# Altium PCB Kasli-DIOT.PCBDOC (part 17 of 23)
Units mm, origin at the board's own origin, x right, y up, seen from the top; angles counter-clockwise.
Board outline 222.9 x 100 mm, 10 copper layers (TopLayer, Layer 2, Layer 3, Layer 4, Layer 5, Layer 6, Layer 7, layer 8, Layer 9, BottomLayer), stack 1.564 mm thick; 977 components, 900 nets, 4676 pads, 2725 vias.
Unrouted connection lines stored in the file: 17.
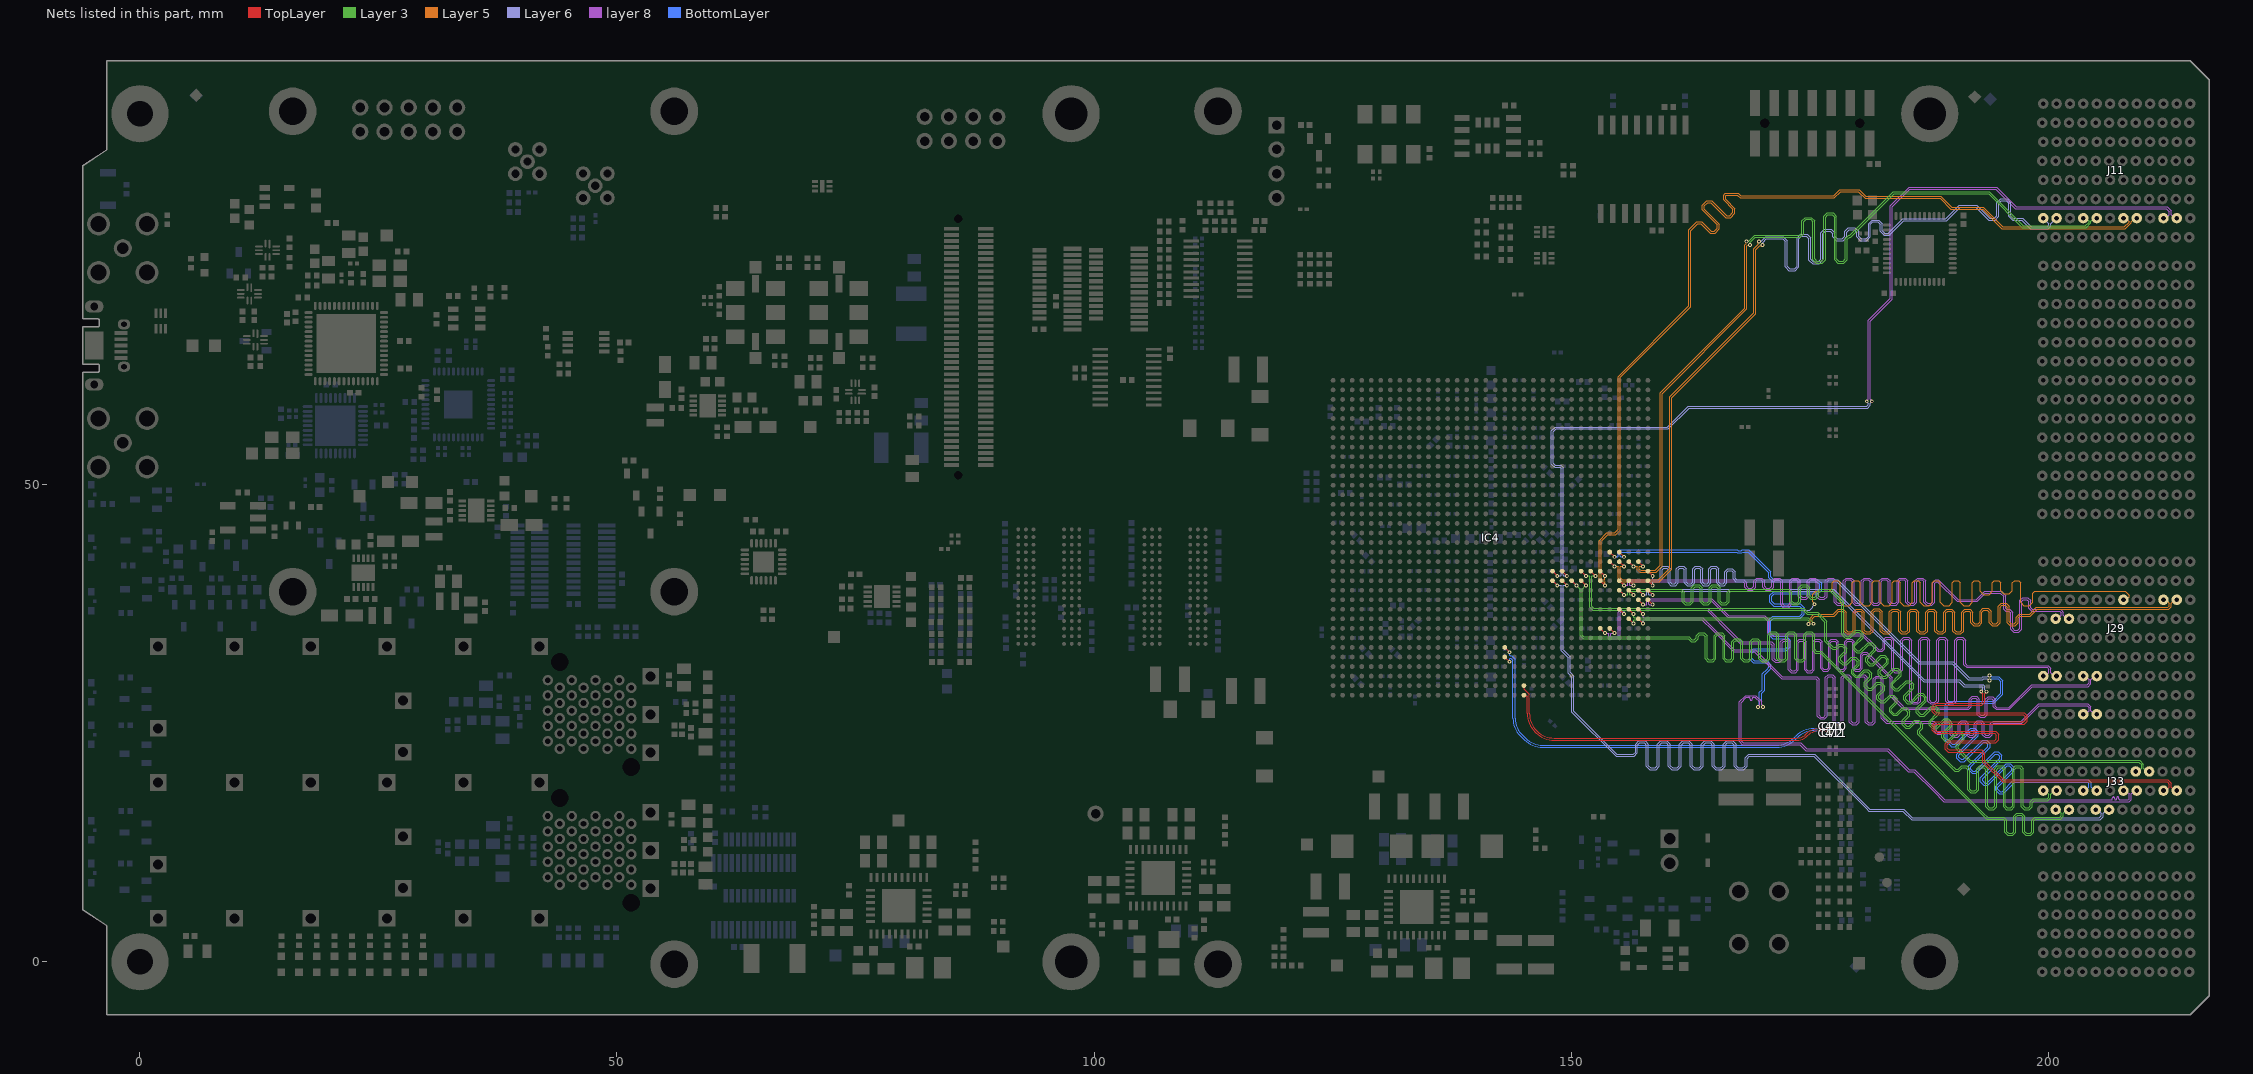
[diagram p23: the nets of this part, all layers, seen from the top]

## Via types
v1: diameter 0.4, hole 0.2, TopLayer to BottomLayer, tented both sides, 1723 vias
v2: diameter 0.5, hole 0.2, TopLayer to BottomLayer, tented both sides, 524 vias
v3: diameter 0.6, hole 0.3, TopLayer to BottomLayer, tented both sides, 172 vias
v4: diameter 0.6, hole 0.3, TopLayer to BottomLayer, 113 vias
v5: diameter 0.5, hole 0.2, TopLayer to BottomLayer, 107 vias
v6: diameter 0.4, hole 0.2, TopLayer to BottomLayer, 67 vias
v7: diameter 0.5, hole 0.25, TopLayer to BottomLayer, tented both sides, 12 vias
v8: diameter 0.8, hole 0.5, TopLayer to BottomLayer, tented both sides, 7 vias

## Nets (pads, with @x,y where several pads share a name; then routed paths per layer and width w, separated by ;. In a path a pad name is that pad's centre, name@x,y a point inside that pad or via, vN(x,y) a via of type N, cw(c..) or ccw(c..) an arc to the next point about the centre after c; other vN are vias at no path point) (continued)
SLOT2.LVDS_4_N: IC4.AB32 J29.K5 | length 99.8
  TopLayer w0.095: IC4.AB32@156.061,39.95 v1(156.561,39.45)
  layer 8 w0.075: v1(156.561,39.45) 156.206,39.45 156.162,39.494 156.162,39.71 156.302,39.85 166.341,39.85 168.026,39.85 168.21,39.666 168.21,39.257 168.513,38.954 169.049,38.954 169.351,39.257 169.351,39.84 169.536,40.024 169.904,40.024 170.088,39.84 170.088,39.257 170.391,38.954 170.927,38.954 171.229,39.257 171.229,39.84 171.414,40.024 171.782,40.024 171.966,39.84 171.966,37.425 172.269,37.123 172.805,37.123 173.107,37.425 173.107,39.84 173.292,40.024 173.66,40.024 173.844,39.84 173.844,38.316 174.147,38.014 174.683,38.014 174.985,38.316 174.985,39.84 175.17,40.024 175.538,40.024 175.722,39.84 175.722,38.29 176.025,37.988 176.561,37.988 176.863,38.29 176.863,39.84 177.048,40.024 177.416,40.024 177.6,39.84 177.6,37.678 177.903,37.375 178.439,37.375 178.741,37.678 178.741,39.84 178.926,40.024 179.294,40.024 179.478,39.84 179.478,37.678 179.781,37.375 180.317,37.375 180.619,37.678 180.619,39.84 180.804,40.024 181.172,40.024 181.356,39.84 181.356,37.678 181.659,37.375 182.195,37.375 182.497,37.678 182.497,39.84 182.682,40.024 183.05,40.024 183.234,39.84 183.234,37.678 183.537,37.375 184.073,37.375 184.375,37.678 184.375,39.84 184.56,40.024 184.928,40.024 185.112,39.84 185.112,37.678 185.415,37.375 185.951,37.375 186.253,37.678 186.253,39.84 186.438,40.024 186.806,40.024 186.99,39.84 186.99,37.678 187.293,37.375 187.829,37.375 188.131,37.678 188.131,39.666 188.316,39.85 188.412,39.85 190.489,37.773 192.568,37.773 193.443,38.648 194.692,38.648 ; 194.692,38.654 195.011,38.654 195.359,38.307 195.359,36.969 195.521,36.807 195.58,36.748 195.748,36.748 ; 195.749,36.749 195.909,36.749 196.093,36.565 196.093,34.862 196.396,34.56 196.932,34.56 197.234,34.862 197.234,37.792 197.418,37.976 197.787,37.976 197.971,37.792 197.971,37.052 198.274,36.749 198.868,36.749 ; 198.869,36.75 199.393,36.75 201.226,36.75 201.399,36.577 201.399,36.311 201.038,35.95 J29.K5@200.8,35.95
SLOT2.LVDS_4_P: IC4.AB31 J29.J5 | length 100.5
  TopLayer w0.095: IC4.AB31@155.061,39.95 v1(155.561,39.45)
  layer 8 w0.075: v1(155.561,39.45) 155.916,39.45 155.96,39.494 155.96,39.794 156.218,40.052 166.341,40.052 168.11,40.052 168.412,39.749 168.412,39.341 168.597,39.157 168.965,39.157 169.149,39.341 169.149,39.923 169.452,40.226 169.988,40.226 170.29,39.923 170.29,39.341 170.475,39.157 170.843,39.157 171.027,39.341 171.027,39.923 171.33,40.226 171.866,40.226 172.168,39.923 172.168,37.509 172.353,37.325 172.721,37.325 172.905,37.509 172.905,39.923 173.208,40.226 173.744,40.226 174.046,39.923 174.046,38.4 174.231,38.216 174.599,38.216 174.783,38.4 174.783,39.923 175.086,40.226 175.622,40.226 175.924,39.923 175.924,38.374 176.109,38.19 176.477,38.19 176.661,38.374 176.661,39.923 176.964,40.226 177.5,40.226 177.802,39.923 177.802,37.762 177.987,37.577 178.355,37.577 178.539,37.762 178.539,39.923 178.842,40.226 179.378,40.226 179.68,39.923 179.68,37.762 179.865,37.577 180.233,37.577 180.417,37.762 180.417,39.923 180.72,40.226 181.256,40.226 181.558,39.923 181.558,37.762 181.743,37.577 182.111,37.577 182.295,37.762 182.295,39.923 182.598,40.226 183.134,40.226 183.436,39.923 183.436,37.762 183.621,37.577 183.989,37.577 184.173,37.762 184.173,39.923 184.476,40.226 185.012,40.226 185.314,39.923 185.314,37.762 185.499,37.577 185.867,37.577 186.051,37.762 186.051,39.923 186.354,40.226 186.89,40.226 187.192,39.923 187.192,37.762 187.377,37.577 187.745,37.577 187.929,37.762 187.929,39.749 188.232,40.052 188.412,40.052 188.496,40.052 190.573,37.975 192.484,37.975 193.359,38.85 194.608,38.85 194.615,38.856 195.095,38.856 195.561,38.39 195.561,38.216 195.561,37.053 195.663,36.95 ; 195.666,36.951 195.993,36.951 196.295,36.649 196.295,34.946 196.479,34.762 196.848,34.762 197.032,34.946 197.032,37.876 197.335,38.178 197.871,38.178 198.173,37.876 198.173,37.135 198.357,36.951 198.785,36.951 ; 198.786,36.952 199.393,36.952 201.31,36.952 201.601,36.661 201.601,36.311 201.962,35.95 J29.J5@202.2,35.95
SLOT2.LVDS_5_N: IC4.AB25 J33.H3 | length 100.2
  TopLayer w0.095: IC4.AB25@149.061,39.95 v1(149.561,39.45)
  Layer 6 w0.08: v1(149.561,39.45) 149.211,39.45 149.165,39.403 149.165,32.7 149.895,31.969 149.895,30.353 150.308,29.939 150.308,26.245 154.803,21.75 156.425,21.75 156.526,21.75 156.761,21.985 156.761,22.801 157.118,23.158 157.761,23.158 158.117,22.801 158.117,20.578 158.353,20.342 158.824,20.342 159.059,20.578 159.059,22.801 159.416,23.158 160.059,23.158 160.415,22.801 160.415,20.578 160.651,20.342 161.122,20.342 161.357,20.578 161.357,22.801 161.714,23.158 162.357,23.158 162.713,22.801 162.713,20.578 162.949,20.342 163.42,20.342 163.655,20.578 163.655,22.801 164.012,23.158 164.655,23.158 165.011,22.801 165.011,20.578 165.247,20.342 165.718,20.342 165.953,20.578 165.953,22.801 166.31,23.158 166.953,23.158 167.309,22.801 167.309,20.578 167.545,20.342 168.016,20.342 168.251,20.578 168.251,21.393 168.608,21.75 169.745,21.75 175.547,21.75 181.013,16.284 181.318,15.979 184.873,15.979 185.776,15.076 205.383,15.076 205.596,15.289 205.596,15.599 205.245,15.95 J33.H3@205,15.95
SLOT2.LVDS_5_P: IC4.AB24 J33.G3 | length 100.8
  TopLayer w0.095: IC4.AB24@148.061,39.95 v1(148.561,39.45)
  Layer 6 w0.08: v1(148.561,39.45) 148.911,39.45 148.958,39.403 148.958,32.614 149.688,31.884 149.688,30.267 150.101,29.854 150.101,26.16 154.718,21.543 156.425,21.543 156.612,21.543 156.968,21.9 156.968,22.715 157.204,22.951 157.675,22.951 157.91,22.715 157.91,20.492 158.267,20.135 158.91,20.135 159.266,20.492 159.266,22.715 159.502,22.951 159.973,22.951 160.208,22.715 160.208,20.492 160.565,20.135 161.208,20.135 161.564,20.492 161.564,22.715 161.8,22.951 162.271,22.951 162.506,22.715 162.506,20.492 162.863,20.135 163.506,20.135 163.862,20.492 163.862,22.715 164.098,22.951 164.569,22.951 164.804,22.715 164.804,20.492 165.161,20.135 165.804,20.135 166.16,20.492 166.16,22.715 166.396,22.951 166.867,22.951 167.102,22.715 167.102,20.492 167.459,20.135 168.102,20.135 168.458,20.492 168.458,21.308 168.694,21.543 169.745,21.543 175.461,21.543 180.927,16.077 181.232,15.772 184.787,15.772 185.691,14.869 205.469,14.869 205.803,15.203 205.803,15.599 206.155,15.95 J33.G3@206.4,15.95
SLOT2.LVDS_6_N: IC4.AB27 J33.K3 | length 102
  TopLayer w0.095: IC4.AB27@151.061,39.95 v1(151.561,39.45)
  Layer 3 w0.075: v1(151.561,39.45) 151.161,39.05 151.161,34.25 151.261,34.15 151.361,34.05 162.382,34.05 162.491,33.941 162.671,33.761 162.932,33.761 163.116,33.945 163.116,34.17 163.419,34.473 163.955,34.473 164.257,34.17 164.257,31.843 164.441,31.659 164.81,31.659 164.994,31.843 164.994,34.17 165.297,34.473 165.833,34.473 166.135,34.17 166.135,31.843 166.319,31.659 166.688,31.659 166.872,31.843 166.872,33.555 167.175,33.858 167.711,33.858 168.013,33.555 168.013,31.843 168.197,31.659 168.566,31.659 168.75,31.843 168.75,33.56 169.053,33.863 169.589,33.863 169.891,33.56 169.891,31.843 170.075,31.659 170.444,31.659 170.628,31.843 170.628,34.295 170.931,34.598 171.467,34.598 171.769,34.295 171.769,31.843 171.953,31.659 172.322,31.659 172.506,31.843 172.506,34.295 172.809,34.598 173.345,34.598 173.647,34.295 173.647,31.843 173.831,31.659 174.2,31.659 174.384,31.843 174.384,34.295 174.687,34.598 175.223,34.598 175.525,34.295 175.525,32.751 175.709,32.567 176.254,32.567 184.814,24.007 193.231,15.589 193.671,15.15 194.021,15.15 195.383,15.15 195.686,14.847 195.686,13.64 195.87,13.456 196.238,13.456 196.423,13.64 196.423,15.283 196.725,15.586 197.261,15.586 197.564,15.283 197.564,13.64 197.748,13.456 198.116,13.456 198.301,13.64 198.301,14.847 198.603,15.15 200.662,15.15 201.232,15.15 201.399,15.317 201.399,15.589 201.038,15.95 J33.K3@200.8,15.95
SLOT2.LVDS_6_P: IC4.AB26 J33.J3 | length 102.7
  TopLayer w0.095: IC4.AB26@150.061,39.95 v1(150.561,39.45)
  Layer 3 w0.075: v1(150.561,39.45) 150.959,39.052 150.959,34.166 151.159,33.966 151.277,33.848 162.299,33.848 162.491,33.656 162.588,33.559 163.016,33.559 163.318,33.862 163.318,34.087 163.502,34.271 163.871,34.271 164.055,34.087 164.055,31.759 164.358,31.457 164.894,31.457 165.196,31.759 165.196,34.087 165.38,34.271 165.749,34.271 165.933,34.087 165.933,31.759 166.236,31.457 166.772,31.457 167.074,31.759 167.074,33.472 167.258,33.656 167.627,33.656 167.811,33.472 167.811,31.759 168.114,31.457 168.65,31.457 168.952,31.759 168.952,33.476 169.136,33.66 169.505,33.66 169.689,33.476 169.689,31.759 169.992,31.457 170.528,31.457 170.83,31.759 170.83,34.212 171.014,34.396 171.383,34.396 171.567,34.212 171.567,31.759 171.87,31.457 172.406,31.457 172.708,31.759 172.708,34.212 172.892,34.396 173.261,34.396 173.445,34.212 173.445,31.759 173.748,31.457 174.284,31.457 174.586,31.759 174.586,34.212 174.77,34.396 175.139,34.396 175.323,34.212 175.323,32.667 175.626,32.365 176.17,32.365 176.254,32.281 184.612,23.923 193.017,15.518 193.587,14.948 194.021,14.948 195.299,14.948 195.484,14.764 195.484,13.556 195.786,13.254 196.322,13.254 196.625,13.556 196.625,15.2 196.809,15.384 197.177,15.384 197.362,15.2 197.362,13.556 197.664,13.254 198.2,13.254 198.503,13.556 198.503,14.764 198.687,14.948 200.662,14.948 201.316,14.948 201.601,15.233 201.601,15.589 201.962,15.95 J33.J3@202.2,15.95
SLOT2.LVDS_7_N: IC4.AC34 J33.C4 | length 109.2
  TopLayer w0.095: IC4.AC34@158.061,38.95 v1(158.561,38.45) ; v1(193.002,28.32) 193.002,28.281 193.17,28.112 193.17,27.55 193.17,27.288 192.981,27.099 188.182,27.099 187.862,26.78 187.862,26.217 188.182,25.898 197.422,25.898 197.611,25.709 197.611,25.33 197.422,25.141 188.182,25.141 187.862,24.822 187.862,24.259 188.182,23.94 194.402,23.94 194.591,23.751 194.591,23.372 194.402,23.183 189.556,23.183 189.237,22.864 189.237,22.301 189.556,21.982 192.981,21.982 193.17,21.793 193.17,21.68 193.17,20.927 195.247,18.85 212.475,18.85 212.689,18.636 212.689,18.307 212.332,17.95 J33.C4@212.1,17.95
  Layer 6 w0.08: v1(158.561,38.45) 158.211,38.45 158.165,38.497 158.165,38.754 158.261,38.85 177.459,38.85 186.966,29.343 190.668,29.343 191.168,28.843 193.123,28.843 193.179,28.787 193.179,28.527 193.002,28.35 v1(193.002,28.32)
SLOT2.LVDS_7_P: IC4.AC33 J33.B4 | length 109.9
  TopLayer w0.095: IC4.AC33@157.061,38.95 v1(157.561,38.45) ; v1(193.561,28.317) 193.561,28.278 193.392,28.109 193.392,27.55 193.392,27.196 193.073,26.877 188.274,26.877 188.084,26.688 188.084,26.309 188.274,26.12 197.514,26.12 197.833,25.801 197.833,25.238 197.514,24.919 188.274,24.919 188.084,24.73 188.084,24.351 188.274,24.162 194.494,24.162 194.813,23.843 194.813,23.28 194.494,22.961 189.648,22.961 189.459,22.772 189.459,22.393 189.648,22.204 193.073,22.204 193.392,21.885 193.392,21.68 193.392,21.019 195.339,19.072 212.567,19.072 212.911,18.728 212.911,18.307 213.268,17.95 J33.B4@213.5,17.95
  Layer 6 w0.08: v1(157.561,38.45) 157.911,38.45 157.958,38.497 157.958,38.839 158.175,39.057 177.545,39.057 187.052,29.55 190.754,29.55 191.254,29.05 193.209,29.05 193.386,28.873 193.386,28.524 193.561,28.349 v1(193.561,28.317)
SLOT2.LVDS_8_N: IC4.W31 J33.F4 | length 108
  TopLayer w0.095: IC4.W31@155.061,42.95 v1(155.561,42.45)
  layer 8 w0.075: v1(169.603,26.714) 169.603,26.757 169.765,26.92 169.765,27.24 169.304,27.701 169.296,27.709 169.105,27.709 ccw(c169.105,27.597) 168.992,27.597 168.992,27.514 cw(c168.88,27.514) 168.88,27.401 cw(c168.88,27.514) 168.767,27.514 168.767,27.597 ccw(c168.655,27.597) 168.655,27.709 168.392,27.709 168.375,27.709 167.84,27.174 167.84,23.18 168.047,22.973 174.068,22.973 174.663,22.378 174.708,22.333 183.237,22.333 183.562,22.008 185.435,20.135 186.013,20.135 188.072,18.075 189.172,16.975 195.102,16.975 206.45,16.975 206.637,16.975 ccw(c206.637,17.087) 206.75,17.087 206.75,17.171 cw(c206.862,17.171) 206.862,17.283 cw(c206.862,17.171) 206.975,17.171 206.975,17.088 ccw(c207.087,17.088) 207.087,16.975 ccw(c207.087,17.088) 207.2,17.088 207.2,17.171 cw(c207.312,17.171) 207.312,17.283 cw(c207.312,17.171) 207.425,17.171 207.425,17.087 ccw(c207.537,17.087) 207.537,16.975 207.8,16.975 208.411,16.975 208.499,17.063 208.499,17.601 208.149,17.95 J33.F4@207.9,17.95
  BottomLayer w0.095: v1(155.561,42.45) 155.228,42.45 155.172,42.506 155.172,42.827 155.299,42.954 167.351,42.954 167.45,42.855 167.922,42.855 168.021,42.954 168.557,42.954 169.561,41.95 170.739,40.772 170.739,40.45 170.739,40.246 171.133,39.851 175.783,39.851 176.047,39.587 176.047,39.058 175.783,38.794 171.228,38.794 170.833,38.4 170.833,37.688 171.228,37.293 173.96,37.293 174.225,37.029 174.225,36.5 173.96,36.236 171.133,36.236 170.739,35.842 170.739,35.532 170.739,34.483 170.739,34.279 171.133,33.885 172.483,33.885 172.747,33.62 172.747,33.092 172.483,32.828 169.125,32.828 168.731,32.433 168.731,31.721 169.125,31.327 170.475,31.327 170.739,31.062 170.739,30.867 170.55,30.678 170.061,30.189 170.061,28.539 169.755,28.233 169.755,26.922 169.603,26.769 v1(169.603,26.714)
SLOT2.LVDS_8_P: IC4.W30 J33.E4 | length 108.9
  TopLayer w0.095: IC4.W30@154.061,42.95 v1(154.561,42.45)
  layer 8 w0.075: v1(170.13,26.714) 170.13,26.757 169.967,26.92 169.967,27.323 169.38,27.911 168.291,27.911 167.638,27.258 167.638,23.096 167.963,22.771 173.984,22.771 174.52,22.235 ; 174.521,22.234 174.624,22.131 183.153,22.131 183.478,21.806 185.351,19.933 185.929,19.933 188.001,17.861 189.089,16.773 195.019,16.773 195.102,16.773 208.495,16.773 208.701,16.979 208.701,17.399 208.701,17.601 209.05,17.95 J33.E4@209.3,17.95
  BottomLayer w0.095: v1(154.561,42.45) 154.894,42.45 154.95,42.506 154.95,42.919 155.207,43.176 167.443,43.176 167.542,43.078 167.83,43.078 167.929,43.176 168.649,43.176 169.783,42.042 170.961,40.864 170.961,40.45 170.961,40.337 171.225,40.073 175.875,40.073 176.269,39.679 176.269,38.967 175.875,38.572 171.32,38.572 171.055,38.308 171.055,37.779 171.32,37.515 174.052,37.515 174.447,37.121 174.447,36.409 174.052,36.014 171.225,36.014 170.961,35.75 170.961,35.532 170.961,34.483 170.961,34.371 171.225,34.107 172.575,34.107 172.969,33.712 172.969,33 172.575,32.606 169.217,32.606 168.953,32.341 168.953,31.813 169.217,31.549 170.567,31.549 170.961,31.154 170.961,30.775 170.864,30.678 170.283,30.097 170.283,28.447 169.977,28.141 169.977,26.922 170.13,26.769 v1(170.13,26.714)
SLOT2.LVDS_9_N: IC4.AB34 J33.I4 | length 110.3
  TopLayer w0.095: IC4.AB34@158.061,39.95 v1(158.561,39.45)
  Layer 6 w0.08: v1(158.561,39.45) 158.561,39.8 158.608,39.846 159.084,39.846 159.271,39.846 159.553,40.128 159.553,41.115 159.713,41.275 160.034,41.275 160.195,41.115 160.195,39.719 160.476,39.437 160.969,39.437 161.251,39.719 161.251,41.115 161.411,41.275 161.732,41.275 161.893,41.115 161.893,39.719 162.174,39.437 162.667,39.437 162.949,39.719 162.949,41.115 163.109,41.275 163.43,41.275 163.591,41.115 163.591,39.719 163.872,39.437 164.365,39.437 164.647,39.719 164.647,41.115 164.807,41.275 165.128,41.275 165.289,41.115 165.289,39.719 165.57,39.437 166.063,39.437 166.345,39.719 166.345,40.815 166.505,40.975 166.826,40.975 166.987,40.815 166.987,40.128 167.268,39.846 168.794,39.846 177.872,39.846 186.468,31.25 189.968,31.25 191.642,29.576 193.166,29.576 193.247,29.658 193.654,29.658 193.814,29.498 v1(193.861,29.498)
  BottomLayer w0.095: v1(193.861,29.498) 193.944,29.498 194.096,29.65 194.761,29.65 194.961,29.45 195.039,29.372 195.039,28.139 194.234,27.334 189.625,27.334 189.217,26.926 189.217,23.214 189.728,22.703 189.873,22.558 190.289,22.558 191.998,24.267 192.23,24.267 192.462,24.034 192.462,23.802 190.43,21.77 190.43,21.354 190.792,20.991 191.208,20.991 193.241,23.024 193.473,23.024 193.705,22.791 193.705,22.559 191.673,20.527 191.673,20.111 192.035,19.748 192.452,19.748 194.484,21.78 194.716,21.78 194.948,21.548 194.948,21.316 192.916,19.284 192.916,18.867 193.278,18.505 193.695,18.505 195.727,20.537 195.959,20.537 196.191,20.305 196.191,20.073 194.526,18.408 194.526,17.991 194.889,17.629 195.305,17.629 196.52,18.845 196.93,18.845 204.145,18.845 204.289,18.701 204.289,18.307 203.932,17.95 J33.I4@203.7,17.95
SLOT2.LVDS_9_P: IC4.AA34 J33.H4 | length 110.7
  TopLayer w0.095: IC4.AA34@158.061,40.95 v1(158.561,40.45)
  Layer 6 w0.08: v1(158.561,40.45) 158.561,40.1 158.608,40.053 159.084,40.053 159.185,40.053 159.346,40.214 159.346,41.201 159.627,41.482 160.12,41.482 160.402,41.201 160.402,39.804 160.562,39.644 160.883,39.644 161.044,39.804 161.044,41.201 161.325,41.482 161.818,41.482 162.1,41.201 162.1,39.804 162.26,39.644 162.581,39.644 162.742,39.804 162.742,41.201 163.023,41.482 163.516,41.482 163.798,41.201 163.798,39.804 163.958,39.644 164.279,39.644 164.44,39.804 164.44,41.201 164.721,41.482 165.214,41.482 165.496,41.201 165.496,39.804 165.656,39.644 165.977,39.644 166.138,39.804 166.138,40.901 166.419,41.182 166.912,41.182 167.194,40.901 167.194,40.214 167.354,40.053 168.794,40.053 177.958,40.053 186.554,31.457 190.054,31.457 191.728,29.783 193.08,29.783 193.162,29.865 193.654,29.865 193.814,30.025 v1(193.861,30.025)
  BottomLayer w0.095: v1(193.861,30.025) 193.944,30.025 194.096,29.872 194.853,29.872 195.261,29.464 195.261,28.047 194.326,27.112 189.717,27.112 189.439,26.834 189.439,23.306 189.885,22.86 189.965,22.78 190.197,22.78 191.906,24.489 192.322,24.489 192.684,24.126 192.684,23.71 190.652,21.678 190.652,21.446 190.884,21.213 191.116,21.213 193.149,23.246 193.565,23.246 193.927,22.883 193.927,22.467 191.895,20.435 191.895,20.202 192.127,19.97 192.36,19.97 194.392,22.002 194.808,22.002 195.17,21.64 195.17,21.224 193.138,19.192 193.138,18.959 193.37,18.727 193.603,18.727 195.635,20.759 196.051,20.759 196.413,20.397 196.413,19.981 194.748,18.316 194.748,18.083 194.981,17.851 195.213,17.851 196.428,19.067 197.152,19.067 204.237,19.067 204.511,18.793 204.511,18.307 204.868,17.95 J33.H4@205.1,17.95
SLOT2.LVDS_10_N: IC4.AA28 J33.L4 | length 101.4
  TopLayer w0.095: IC4.AA28@152.061,40.95 v1(152.561,40.45)
  Layer 3 w0.075: v1(152.561,40.45) 152.206,40.45 152.162,40.406 152.162,39.45 152.161,39.449 152.161,37.25 152.359,37.052 174.408,37.052 174.832,36.628 175.879,36.628 176.812,35.695 176.812,33.666 177.445,33.033 177.513,32.965 177.774,32.965 178.072,33.262 178.5,33.262 178.879,32.883 178.879,32.456 178.28,31.857 178.28,31.596 178.541,31.336 178.801,31.336 179.4,31.934 179.828,31.934 180.207,31.556 180.207,31.128 179.608,30.529 179.608,30.268 179.868,30.008 180.129,30.008 180.728,30.606 181.156,30.606 181.535,30.228 181.535,29.8 180.936,29.201 180.936,28.94 181.196,28.68 181.457,28.68 182.056,29.279 182.484,29.279 182.862,28.9 182.862,28.472 182.264,27.873 182.264,27.613 182.524,27.352 182.785,27.352 183.384,27.951 183.812,27.951 184.19,27.572 184.19,27.144 183.592,26.545 183.592,26.285 183.852,26.024 184.113,26.024 184.712,26.623 185.139,26.623 185.518,26.244 185.518,25.816 184.92,25.217 184.92,24.957 185.18,24.696 185.441,24.696 186.039,25.295 186.467,25.295 186.846,24.916 186.846,24.488 186.548,24.19 186.548,23.93 186.587,23.891 186.655,23.823 190.019,20.459 190.102,20.376 190.314,20.164 190.574,20.164 190.946,20.536 191.482,20.536 191.785,20.234 191.785,18.095 191.969,17.911 192.338,17.911 192.522,18.095 192.522,20.23 192.824,20.532 193.36,20.532 193.663,20.23 193.663,16.344 193.847,16.16 194.216,16.16 194.4,16.344 194.4,20.23 194.702,20.532 195.238,20.532 195.541,20.23 195.541,16.344 195.725,16.16 196.094,16.16 196.278,16.344 196.278,20.23 196.58,20.532 197.116,20.532 197.419,20.23 197.419,16.344 197.603,16.16 197.972,16.16 198.156,16.344 198.156,16.765 198.458,17.068 199.264,17.068 199.905,17.068 200.099,17.262 200.099,17.589 199.738,17.95 J33.L4@199.5,17.95
SLOT2.LVDS_10_P: IC4.AA27 J33.K4 | length 102
  TopLayer w0.095: IC4.AA27@151.061,40.95 v1(151.561,40.45)
  Layer 3 w0.075: v1(151.561,40.45) 151.916,40.45 151.96,40.406 151.96,39.533 151.959,39.532 151.959,37.166 152.275,36.85 174.324,36.85 174.748,36.426 175.795,36.426 176.61,35.611 176.61,33.582 177.302,32.89 177.371,32.822 177.43,32.763 177.858,32.763 178.155,33.06 178.416,33.06 178.677,32.8 178.677,32.539 178.078,31.941 178.078,31.513 178.457,31.134 178.885,31.134 179.483,31.732 179.744,31.732 180.005,31.472 180.005,31.211 179.406,30.613 179.406,30.185 179.785,29.806 180.213,29.806 180.811,30.404 181.072,30.404 181.333,30.144 181.333,29.883 180.734,29.285 180.734,28.857 181.113,28.478 181.541,28.478 182.139,29.077 182.4,29.077 182.66,28.816 182.66,28.555 182.062,27.957 182.062,27.529 182.441,27.15 182.869,27.15 183.467,27.749 183.728,27.749 183.988,27.488 183.988,27.227 183.39,26.629 183.39,26.201 183.769,25.822 184.197,25.822 184.795,26.421 185.056,26.421 185.316,26.16 185.316,25.9 184.718,25.301 184.718,24.873 185.097,24.494 185.525,24.494 186.123,25.093 186.384,25.093 186.644,24.832 186.644,24.572 186.346,24.274 186.346,23.846 186.444,23.748 186.512,23.68 190.019,20.174 190.23,19.962 190.658,19.962 191.03,20.334 191.399,20.334 191.583,20.15 191.583,18.011 191.885,17.709 192.421,17.709 192.724,18.011 192.724,20.146 192.908,20.33 193.277,20.33 193.461,20.146 193.461,16.26 193.763,15.958 194.299,15.958 194.602,16.26 194.602,20.146 194.786,20.33 195.155,20.33 195.339,20.146 195.339,16.26 195.641,15.958 196.177,15.958 196.48,16.26 196.48,20.146 196.664,20.33 197.033,20.33 197.217,20.146 197.217,16.26 197.519,15.958 198.055,15.958 198.358,16.26 198.358,16.681 198.542,16.866 199.264,16.866 199.988,16.866 200.301,17.178 200.301,17.589 200.662,17.95 J33.K4@200.9,17.95
SLOT2.LVDS_11_N: IC4.AA25 J11.C2 | length 105.1
  TopLayer w0.095: IC4.AA25@149.061,40.95 v1(149.561,40.45)
  Layer 6 w0.08: v1(149.561,40.45) 149.211,40.45 149.165,40.497 149.165,51.839 148.947,52.057 148.361,52.057 148.161,52.257 148.161,55.569 148.442,55.85 160.186,55.85 162.379,58.043 181.092,58.043 181.368,58.319 181.368,58.543 181.528,58.703 v1(181.528,58.75)
  layer 8 w0.075: v1(181.528,58.75) 181.528,58.794 181.366,58.956 181.366,67.149 183.675,69.459 183.675,79.164 185.512,81.001 194.524,81.001 196.467,79.058 196.585,78.94 212.396,78.94 212.699,78.637 212.699,78.299 212.349,77.95 J11.C2@212.1,77.95
SLOT2.LVDS_11_P: IC4.AA24 J11.B2 | length 105.8
  TopLayer w0.095: IC4.AA24@148.061,40.95 v1(148.561,40.45)
  Layer 6 w0.08: v1(148.561,40.45) 148.911,40.45 148.958,40.497 148.958,51.754 148.861,51.85 148.275,51.85 147.954,52.171 147.954,55.655 148.356,56.057 160.1,56.057 162.293,58.25 181.006,58.25 181.161,58.405 181.161,58.543 181.001,58.703 v1(181.001,58.75)
  layer 8 w0.075: v1(181.001,58.75) 181.001,58.794 181.164,58.956 181.164,67.233 183.473,69.542 183.473,79.247 185.429,81.203 194.607,81.203 196.669,79.142 212.48,79.142 212.901,78.721 212.901,78.299 213.25,77.95 J11.B2@213.5,77.95
SLOT2.LVDS_12_N: IC4.AB29 J11.F2 | length 101.8
  TopLayer w0.095: IC4.AB29@153.061,39.95 v1(153.561,39.45)
  Layer 5 w0.08: v1(153.561,39.45) 153.561,39.8 153.514,39.846 153.15,39.846 152.954,40.043 152.954,44.143 153.768,44.957 154.587,44.957 154.954,45.324 154.954,61.343 162.354,68.743 162.354,76.38 162.354,76.736 163.193,77.574 163.697,77.574 164.686,76.585 165.019,76.585 165.352,76.918 165.352,77.251 163.78,78.823 163.78,79.328 164.234,79.782 164.739,79.782 166.311,78.21 166.644,78.21 166.977,78.543 166.977,78.876 165.988,79.865 165.988,80.37 166.12,80.502 166.181,80.562 167.521,80.562 167.809,80.274 177.53,80.274 178.178,80.923 180.218,80.923 180.916,80.225 188.767,80.225 189.91,79.082 193.229,79.082 195.261,77.05 208.014,77.05 208.496,77.533 208.496,77.599 208.145,77.95 J11.F2@207.9,77.95
SLOT2.LVDS_12_P: IC4.AA29 J11.E2 | length 101.4
  TopLayer w0.095: IC4.AA29@153.061,40.95 v1(153.561,40.45)
  Layer 5 w0.08: v1(153.561,40.45) 153.561,40.1 153.514,40.053 153.236,40.053 153.161,40.129 153.161,44.057 153.854,44.75 154.673,44.75 155.161,45.238 155.161,61.257 162.561,68.657 162.561,76.173 162.561,76.65 163.278,77.367 163.611,77.367 164.601,76.378 165.105,76.378 165.559,76.832 165.559,77.337 163.987,78.909 163.987,79.242 164.32,79.575 164.653,79.575 166.226,78.003 166.73,78.003 167.184,78.457 167.184,78.962 166.195,79.951 166.195,80.284 166.266,80.355 167.436,80.355 167.724,80.067 177.615,80.067 178.264,80.716 180.132,80.716 180.83,80.018 188.681,80.018 189.824,78.875 193.143,78.875 195.175,76.843 208.099,76.843 208.703,77.447 208.703,77.599 209.054,77.95 J11.E2@209.3,77.95
SLOT2.LVDS_13_N: IC4.Y33 J11.I2 | length 99.6
  TopLayer w0.095: IC4.Y33@157.061,41.95 v1(157.561,41.45)
  Layer 3 w0.075: v1(168.388,75.523) 168.419,75.554 168.649,75.554 169.246,76.15 173.873,76.15 173.97,76.15 174.204,76.384 174.204,77.66 174.557,78.013 175.193,78.013 175.545,77.66 175.545,73.676 175.78,73.442 176.248,73.442 176.482,73.676 176.482,78.143 176.835,78.495 177.471,78.495 177.823,78.143 177.823,73.676 178.058,73.442 178.526,73.442 178.76,73.676 178.76,75.797 179.113,76.15 179.239,76.15 181.752,78.663 183.799,80.71 193.847,80.71 197.407,77.15 203.91,77.15 204.299,77.539 204.299,77.601 203.949,77.95 J11.I2@203.7,77.95
  Layer 5 w0.08: v1(157.561,41.45) 157.211,41.45 157.165,41.403 157.165,41.166 157.307,41.024 158.835,41.024 159.354,41.543 159.354,59.643 168.234,68.523 168.234,75.142 168.355,75.263 168.355,75.49 v1(168.388,75.523)
SLOT2.LVDS_13_P: IC4.Y32 J11.H2 | length 100.3
  TopLayer w0.095: IC4.Y32@156.061,41.95 v1(156.561,41.45)
  Layer 3 w0.075: v1(168.761,75.15) 168.792,75.181 168.792,75.411 169.329,75.948 173.873,75.948 174.054,75.948 174.406,76.301 174.406,77.576 174.641,77.81 175.109,77.81 175.343,77.576 175.343,73.593 175.696,73.24 176.332,73.24 176.684,73.593 176.684,78.059 176.919,78.293 177.387,78.293 177.621,78.059 177.621,73.593 177.974,73.24 178.61,73.24 178.962,73.593 178.962,75.714 179.197,75.948 179.323,75.948 181.752,78.377 183.883,80.508 193.764,80.508 197.324,76.948 203.994,76.948 204.501,77.455 204.501,77.601 204.85,77.95 J11.H2@205.1,77.95
  Layer 5 w0.08: v1(156.561,41.45) 156.911,41.45 156.958,41.403 156.958,41.08 157.221,40.817 158.921,40.817 159.561,41.457 159.561,59.557 168.441,68.437 168.441,75.056 168.502,75.117 168.728,75.117 v1(168.761,75.15)
SLOT2.LVDS_14_N: IC4.Y31 J11.L2 | length 99.7
  TopLayer w0.095: IC4.Y31@155.061,41.95 v1(155.561,41.45)
  Layer 5 w0.08: v1(155.561,41.45) 155.211,41.45 155.165,41.403 155.165,40.247 155.361,40.05 159.168,40.05 160.354,41.236 160.354,59.236 169.154,68.036 169.154,74.736 169.64,75.222 169.64,75.448 v1(169.701,75.51)
  Layer 6 w0.08: v1(169.701,75.51) 169.735,75.543 169.961,75.543 170.069,75.651 170.4,75.982 171.483,75.982 172.265,75.982 172.647,75.6 172.647,72.93 172.907,72.67 173.428,72.67 173.689,72.93 173.689,75.893 174.07,76.274 174.763,76.274 175.145,75.893 175.145,73.632 175.405,73.372 175.926,73.372 176.187,73.632 176.187,76.406 176.568,76.788 177.261,76.788 177.643,76.406 177.643,76.069 177.903,75.809 178.424,75.809 178.685,76.069 178.685,76.566 179.066,76.947 179.759,76.947 180.141,76.566 180.141,76.072 180.401,75.812 180.922,75.812 181.182,76.072 181.182,77.375 181.564,77.756 182.257,77.756 182.638,77.375 182.638,76.644 182.899,76.383 183.267,76.383 183.928,77.043 184.791,77.907 189.293,77.907 190.693,79.307 192.517,79.307 193.874,77.95 194.286,77.95 194.386,77.95 194.647,78.21 194.647,79.576 195.029,79.958 195.721,79.958 196.103,79.576 196.103,78.21 196.363,77.95 196.955,77.95 197.329,77.95 198.231,77.047 199.956,77.047 200.096,77.188 200.096,77.354 J11.L2@199.5,77.95
SLOT2.LVDS_14_P: IC4.Y30 J11.K2 | length 100.4
  TopLayer w0.095: IC4.Y30@154.061,41.95 v1(154.561,41.45)
  Layer 5 w0.08: v1(154.561,41.45) 154.911,41.45 154.958,41.403 154.958,40.161 155.275,39.843 159.254,39.843 160.561,41.15 160.561,59.15 169.361,67.95 169.361,74.65 169.787,75.076 170.013,75.076 v1(170.074,75.137)
  Layer 6 w0.08: v1(170.074,75.137) 170.107,75.17 170.107,75.396 170.155,75.444 170.486,75.775 171.483,75.775 172.179,75.775 172.44,75.515 172.44,72.844 172.821,72.463 173.514,72.463 173.896,72.844 173.896,75.807 174.156,76.067 174.677,76.067 174.938,75.807 174.938,73.547 175.319,73.165 176.012,73.165 176.394,73.547 176.394,76.321 176.654,76.581 177.175,76.581 177.436,76.321 177.436,75.984 177.817,75.602 178.51,75.602 178.892,75.984 178.892,76.48 179.152,76.74 179.673,76.74 179.934,76.48 179.934,75.987 180.315,75.605 181.008,75.605 181.389,75.987 181.389,77.289 181.65,77.549 182.171,77.549 182.431,77.289 182.431,76.558 182.813,76.176 183.353,76.176 183.928,76.751 184.877,77.7 189.379,77.7 190.779,79.1 192.431,79.1 193.788,77.743 194.286,77.743 194.472,77.743 194.854,78.125 194.854,79.491 195.114,79.751 195.635,79.751 195.896,79.491 195.896,78.125 196.278,77.743 196.955,77.743 197.243,77.743 198.146,76.84 200.042,76.84 200.303,77.102 200.303,77.354 J11.K2@200.9,77.95
SLOT2.LVDS_15_N: IC4.AC32 J33.E5 | length 103.5
  TopLayer w0.095: IC4.AC32@156.061,38.95 v1(156.561,38.45)
  Layer 3 w0.075: v1(156.561,38.45) 156.206,38.45 156.162,38.494 156.162,38.698 156.314,38.85 158.408,38.85 161.487,38.85 161.671,38.666 161.671,37.73 161.974,37.427 162.51,37.427 162.812,37.73 162.812,39.122 162.996,39.306 163.365,39.306 163.549,39.122 163.549,37.73 163.852,37.427 164.388,37.427 164.69,37.73 164.69,39.122 164.874,39.306 165.243,39.306 165.427,39.122 165.427,37.73 165.73,37.427 166.266,37.427 166.568,37.73 166.568,38.666 166.752,38.85 172.755,38.85 172.939,38.666 172.939,37.73 173.242,37.427 173.778,37.427 174.08,37.73 174.08,39.122 174.264,39.306 174.633,39.306 174.817,39.122 174.817,38.316 175.12,38.014 175.656,38.014 175.958,38.316 175.958,38.666 176.142,38.85 176.239,38.85 177.175,38.85 178.371,37.655 178.371,34.318 178.665,34.024 178.792,33.896 179.22,33.896 179.895,34.571 180.155,34.571 180.416,34.31 180.416,34.05 179.559,33.192 179.559,32.765 179.938,32.386 180.366,32.386 181.223,33.243 181.483,33.243 181.744,32.982 181.744,32.722 180.887,31.865 180.887,31.437 181.266,31.058 181.694,31.058 182.551,31.915 182.811,31.915 183.072,31.654 183.072,31.394 182.215,30.537 182.215,30.109 182.594,29.73 183.021,29.73 183.879,30.587 184.139,30.587 184.4,30.326 184.4,30.066 183.543,29.209 183.543,28.781 183.921,28.402 184.349,28.402 185.207,29.259 185.467,29.259 185.728,28.999 185.728,28.738 184.871,27.881 184.871,27.453 185.249,27.074 185.677,27.074 186.535,27.931 186.795,27.931 187.056,27.671 187.056,27.41 186.198,26.553 186.198,26.125 186.577,25.746 187.005,25.746 187.863,26.603 188.123,26.603 188.384,26.343 188.384,26.082 187.526,25.225 187.526,24.797 187.905,24.418 188.333,24.418 189.19,25.275 189.451,25.275 189.712,25.015 189.712,24.754 188.854,23.897 188.854,23.469 189.233,23.09 189.661,23.09 190.518,23.947 190.779,23.947 191.04,23.687 191.04,23.426 190.365,22.752 190.365,22.324 190.65,22.039 191.782,20.907 209.523,20.907 209.799,20.631 209.799,20.311 209.438,19.95 J33.E5@209.2,19.95
SLOT2.LVDS_15_P: IC4.AC31 J33.D5 | length 104.1
  TopLayer w0.095: IC4.AC31@155.061,38.95 v1(155.561,38.45)
  Layer 3 w0.075: v1(155.561,38.45) 155.916,38.45 155.96,38.494 155.96,38.782 156.23,39.052 158.408,39.052 161.571,39.052 161.873,38.749 161.873,37.813 162.057,37.629 162.426,37.629 162.61,37.813 162.61,39.206 162.913,39.508 163.449,39.508 163.751,39.206 163.751,37.813 163.935,37.629 164.304,37.629 164.488,37.813 164.488,39.206 164.791,39.508 165.327,39.508 165.629,39.206 165.629,37.813 165.813,37.629 166.182,37.629 166.366,37.813 166.366,38.749 166.669,39.052 172.839,39.052 173.141,38.749 173.141,37.813 173.325,37.629 173.694,37.629 173.878,37.813 173.878,39.206 174.181,39.508 174.717,39.508 175.019,39.206 175.019,38.4 175.203,38.216 175.572,38.216 175.756,38.4 175.756,38.749 176.059,39.052 176.239,39.052 177.259,39.052 178.573,37.738 178.573,34.402 178.808,34.167 178.867,34.108 178.876,34.098 179.137,34.098 179.811,34.773 180.239,34.773 180.618,34.394 180.618,33.966 179.761,33.109 179.761,32.848 180.021,32.588 180.282,32.588 181.139,33.445 181.567,33.445 181.946,33.066 181.946,32.638 181.089,31.781 181.089,31.52 181.349,31.26 181.61,31.26 182.467,32.117 182.895,32.117 183.274,31.738 183.274,31.31 182.417,30.453 182.417,30.192 182.677,29.932 182.938,29.932 183.795,30.789 184.223,30.789 184.602,30.41 184.602,29.982 183.745,29.125 183.745,28.864 184.005,28.604 184.266,28.604 185.123,29.461 185.551,29.461 185.93,29.082 185.93,28.654 185.073,27.797 185.073,27.536 185.333,27.276 185.594,27.276 186.451,28.133 186.879,28.133 187.258,27.754 187.258,27.326 186.4,26.469 186.4,26.209 186.661,25.948 186.922,25.948 187.779,26.805 188.207,26.805 188.586,26.426 188.586,25.998 187.728,25.141 187.728,24.881 187.989,24.62 188.25,24.62 189.107,25.477 189.535,25.477 189.914,25.098 189.914,24.67 189.056,23.813 189.056,23.553 189.317,23.292 189.578,23.292 190.435,24.149 190.863,24.149 191.242,23.77 191.242,23.342 190.567,22.668 190.567,22.407 190.792,22.182 191.865,21.109 209.606,21.109 210.001,20.715 210.001,20.311 210.362,19.95 J33.D5@210.6,19.95
SLOT2_MGT.MGT_Rx_N: C411.2 IC4.AK19 | length 43
  TopLayer w0.095: IC4.AK19@143.061,31.95 v1(143.561,31.45)
  BottomLayer w0.095: v1(143.561,31.45) 143.561,31.783 143.617,31.839 143.695,31.839 143.909,31.626 143.909,25.517 ccw(c146.451,25.517) 144.653,23.719 145.088,23.284 ccw(c147.04,25.236) 147.036,22.475 ccw(c147.04,25.236) 147.04,22.475 171.545,22.475 ccw(c171.545,25.231) 173.494,23.283 173.711,23.5 cw(c175.435,21.776) 175.435,24.214 176.79,24.214 cw(c176.79,24.061) 176.898,24.169 cw(c176.871,24.143) 176.909,24.143 ccw(c176.946,24.143) 176.919,24.117 177.043,23.993 ccw(c177.086,24.035) C411.2@177.086,23.975
SLOT2_MGT.MGT_Rx_P: C410.2 IC4.AJ19 | length 43.1
  TopLayer w0.095: IC4.AJ19@143.061,32.95 v1(143.561,32.45)
  BottomLayer w0.095: v1(143.561,32.45) 143.561,32.117 143.617,32.061 143.787,32.061 144.131,31.718 144.131,25.518 ccw(c146.454,25.518) 144.811,23.875 145.245,23.441 ccw(c147.041,25.238) 147.041,22.698 171.542,22.698 ccw(c171.542,25.238) 173.338,23.441 173.554,23.657 cw(c175.434,21.778) 175.434,24.436 176.79,24.436 ccw(c176.79,24.589) 176.898,24.481 ccw(c176.871,24.507) 176.909,24.507 cw(c176.946,24.507) 176.919,24.533 177.043,24.657 cw(c177.086,24.615) C410.2@177.086,24.675
SLOT2_MGT.MGT_Tx_N: C72.1 IC4.AP21 | length 35.8
  TopLayer w0.095: IC4.AP21@145.061,27.95 145.128,27.883 145.359,27.883 145.414,27.827 145.414,26.035 ccw(c148.139,26.035) 146.213,24.108 146.284,24.037 ccw(c148.236,25.988) 146.287,24.034 ccw(c148.236,25.988) 148.232,23.228 ccw(c148.236,25.988) 148.236,23.228 173.683,23.228 ccw(c173.683,24.752) 174.76,23.674 ; 174.761,23.675 cw(c176.062,22.374) 176.062,24.214 176.79,24.214 cw(c176.79,24.061) 176.898,24.169 cw(c176.871,24.143) 176.909,24.143 ccw(c176.946,24.143) 176.919,24.117 177.043,23.993 ccw(c177.086,24.035) C72.1@177.086,23.975
SLOT2_MGT.MGT_Tx_P: C71.1 IC4.AN21 | length 36.4
  TopLayer w0.095: IC4.AN21@145.061,28.95 145.093,28.918 145.093,28.573 145.637,28.029 145.637,26.05 ccw(c148.177,26.05) 146.38,24.254 146.441,24.194 ccw(c148.237,25.99) 148.237,23.45 173.682,23.45 ccw(c173.682,24.754) 174.604,23.832 174.606,23.834 cw(c176.059,22.381) 176.059,24.436 176.79,24.436 ccw(c176.79,24.589) 176.898,24.481 ccw(c176.871,24.507) 176.909,24.507 cw(c176.946,24.507) 176.919,24.533 177.043,24.657 cw(c177.086,24.615) C71.1@177.086,24.675
SLOT3.LVDS_0_N: IC4.AG30 J29.I2 | length 98.4
  TopLayer w0.095: IC4.AG30@154.061,34.95 v1(154.561,34.45)
  layer 8 w0.075: v1(154.561,34.45) 154.206,34.45 154.162,34.406 154.162,34.094 154.206,34.05 154.812,34.05 154.961,34.199 154.961,36.651 155.362,37.052 164.343,37.052 166.829,34.566 167.83,33.565 170.536,33.565 171.043,33.565 171.32,33.288 171.32,31.747 171.48,31.588 171.798,31.588 171.957,31.747 171.957,33.546 172.235,33.824 172.721,33.824 172.998,33.546 172.998,30.682 173.158,30.522 173.476,30.522 173.635,30.682 173.635,33.546 173.913,33.824 174.399,33.824 174.676,33.546 174.676,30.682 174.836,30.522 175.154,30.522 175.313,30.682 175.313,33.546 175.591,33.824 176.077,33.824 176.354,33.546 176.354,30.844 176.514,30.685 176.832,30.685 176.991,30.844 176.991,33.546 177.269,33.824 177.755,33.824 178.032,33.546 178.032,30.844 178.192,30.685 178.51,30.685 178.669,30.844 178.669,33.546 178.947,33.824 179.433,33.824 179.71,33.546 179.71,30.844 179.87,30.685 180.188,30.685 180.347,30.844 180.347,32.161 180.625,32.439 181.017,32.439 181.114,32.342 181.604,31.853 183.661,29.795 183.661,27.926 184.667,26.92 184.935,26.653 191.502,26.653 191.599,26.653 191.758,26.812 191.758,27.544 192.036,27.822 192.522,27.822 192.799,27.544 192.799,25.98 192.959,25.821 193.277,25.821 193.436,25.98 193.436,27.502 193.714,27.779 194.2,27.779 194.477,27.502 194.477,26.812 194.637,26.653 194.869,26.653 195.871,26.653 198.268,29.05 204.111,29.05 204.299,29.237 204.299,29.589 203.938,29.95 J29.I2@203.7,29.95
SLOT3.LVDS_0_P: IC4.AG29 J29.H2 | length 99.1
  TopLayer w0.095: IC4.AG29@153.061,34.95 v1(153.561,34.45)
  layer 8 w0.075: v1(153.561,34.45) 153.916,34.45 153.96,34.406 153.96,34.01 154.122,33.848 154.896,33.848 155.163,34.115 155.163,36.567 155.446,36.85 163.175,36.85 164.26,36.85 166.757,34.352 167.746,33.363 170.536,33.363 170.959,33.363 171.118,33.204 171.118,31.664 171.396,31.386 171.882,31.386 172.159,31.664 172.159,33.463 172.319,33.622 172.637,33.622 172.796,33.463 172.796,30.598 173.074,30.32 173.56,30.32 173.837,30.598 173.837,33.463 173.997,33.622 174.315,33.622 174.474,33.463 174.474,30.598 174.752,30.32 175.238,30.32 175.515,30.598 175.515,33.463 175.675,33.622 175.993,33.622 176.152,33.463 176.152,30.76 176.43,30.483 176.916,30.483 177.193,30.76 177.193,33.463 177.353,33.622 177.671,33.622 177.83,33.463 177.83,30.76 178.108,30.483 178.594,30.483 178.871,30.76 178.871,33.463 179.031,33.622 179.349,33.622 179.508,33.463 179.508,30.76 179.786,30.483 180.272,30.483 180.549,30.76 180.549,32.078 180.709,32.237 180.934,32.237 181.114,32.057 181.532,31.638 183.459,29.712 183.459,27.843 184.453,26.849 184.851,26.451 191.502,26.451 191.683,26.451 191.96,26.728 191.96,27.461 192.12,27.62 192.438,27.62 192.597,27.461 192.597,25.896 192.875,25.619 193.361,25.619 193.638,25.896 193.638,27.418 193.798,27.577 194.116,27.577 194.275,27.418 194.275,26.728 194.553,26.451 194.869,26.451 195.955,26.451 198.352,28.848 204.195,28.848 204.501,29.154 204.501,29.589 204.862,29.95 J29.H2@205.1,29.95
SLOT3.LVDS_1_N: IC4.AD34 J29.L2 | length 96.7
  TopLayer w0.095: IC4.AD34@158.061,37.95 v1(158.561,37.45)
  layer 8 w0.075: v1(158.561,37.45) 158.206,37.45 158.162,37.494 158.162,37.806 158.206,37.85 163.975,37.85 163.977,37.848 164.693,37.848 166.447,36.094 170.202,36.094 170.623,35.673 170.623,34.451 170.876,34.199 180.509,34.199 181.666,33.042 181.712,32.996 182.173,32.534 182.601,32.534 182.904,32.837 182.904,33.638 183.088,33.822 183.457,33.822 183.641,33.638 183.641,30.589 183.943,30.287 184.479,30.287 184.782,30.589 184.782,33.638 184.966,33.822 185.335,33.822 185.519,33.638 185.519,27.33 185.821,27.028 186.357,27.028 186.66,27.33 186.66,33.638 186.844,33.822 187.213,33.822 187.397,33.638 187.397,27.33 187.699,27.028 188.235,27.028 188.538,27.33 188.538,33.638 188.722,33.822 189.091,33.822 189.275,33.638 189.275,27.33 189.577,27.028 190.113,27.028 190.416,27.33 190.416,33.638 190.6,33.822 190.969,33.822 191.153,33.638 191.153,31.153 191.455,30.85 192.575,30.85 199.921,30.85 200.099,30.673 200.099,30.311 199.738,29.95 J29.L2@199.5,29.95
SLOT3.LVDS_1_P: IC4.AD33 J29.K2 | length 97.4
  TopLayer w0.095: IC4.AD33@157.061,37.95 v1(157.561,37.45)
  layer 8 w0.075: v1(157.561,37.45) 157.916,37.45 157.96,37.494 157.96,37.89 158.122,38.052 164.059,38.052 164.061,38.05 164.777,38.05 166.53,36.296 170.285,36.296 170.826,35.756 170.826,34.535 170.959,34.401 180.593,34.401 181.666,33.328 181.796,33.198 182.257,32.736 182.518,32.736 182.702,32.921 182.702,33.722 183.004,34.024 183.54,34.024 183.843,33.722 183.843,30.673 184.027,30.489 184.396,30.489 184.58,30.673 184.58,33.722 184.882,34.024 185.418,34.024 185.721,33.722 185.721,27.414 185.905,27.23 186.274,27.23 186.458,27.414 186.458,33.722 186.76,34.024 187.296,34.024 187.599,33.722 187.599,27.414 187.783,27.23 188.152,27.23 188.336,27.414 188.336,33.722 188.638,34.024 189.174,34.024 189.477,33.722 189.477,27.414 189.661,27.23 190.03,27.23 190.214,27.414 190.214,33.722 190.516,34.024 191.052,34.024 191.355,33.722 191.355,31.236 191.539,31.052 192.575,31.052 200.005,31.052 200.301,30.756 200.301,30.311 200.662,29.95 J29.K2@200.9,29.95
SLOT3.LVDS_2_N: IC4.AF33 J33.I8 | length 102.8
  TopLayer w0.095: IC4.AF33@157.061,35.95 v1(157.561,35.45)
  layer 8 w0.075: v1(157.561,35.45) 157.561,35.805 157.605,35.849 163.714,35.849 164.778,34.784 167.045,32.518 169.229,32.518 170.897,30.85 172.072,29.675 174.9,29.675 175.671,29.675 175.83,29.516 175.83,25.737 176.108,25.459 176.594,25.459 176.871,25.737 176.871,29.746 177.031,29.906 177.349,29.906 177.508,29.746 177.508,25.12 177.786,24.843 178.272,24.843 178.549,25.12 178.549,29.746 178.709,29.906 179.027,29.906 179.186,29.746 179.186,25.12 179.464,24.843 179.95,24.843 180.227,25.12 180.227,29.746 180.387,29.906 180.705,29.906 180.864,29.746 180.864,25.12 181.142,24.843 181.628,24.843 181.905,25.12 181.905,29.594 182.065,29.753 182.383,29.753 182.542,29.594 182.542,25.524 183.058,25.008 183.839,25.008 187.332,25.008 187.935,25.008 188.095,24.849 188.095,24.153 188.372,23.876 188.858,23.876 189.136,24.153 189.136,24.882 189.295,25.042 189.613,25.042 189.773,24.882 189.773,23.807 190.05,23.53 190.536,23.53 190.814,23.807 190.814,24.882 190.973,25.042 191.291,25.042 191.451,24.882 191.451,23.807 191.728,23.53 192.214,23.53 192.492,23.807 192.492,24.882 192.651,25.042 192.969,25.042 193.129,24.882 193.129,23.807 193.406,23.53 193.892,23.53 194.17,23.807 194.17,24.849 194.329,25.008 194.426,25.008 197.253,25.008 197.763,25.518 199.094,26.85 204.101,26.85 204.299,26.653 204.299,26.311 203.938,25.95 J33.I8@203.7,25.95
SLOT3.LVDS_2_P: IC4.AE33 J33.H8 | length 103.1
  TopLayer w0.095: IC4.AE33@157.061,36.95 v1(157.561,36.45)
  layer 8 w0.075: v1(157.561,36.45) 157.561,36.095 157.605,36.051 163.798,36.051 165.064,34.784 167.128,32.72 169.313,32.72 170.897,31.136 172.156,29.877 174.9,29.877 175.755,29.877 176.032,29.6 176.032,25.821 176.192,25.661 176.51,25.661 176.669,25.821 176.669,29.83 176.947,30.108 177.433,30.108 177.71,29.83 177.71,25.204 177.87,25.045 178.188,25.045 178.347,25.204 178.347,29.83 178.625,30.108 179.111,30.108 179.388,29.83 179.388,25.204 179.548,25.045 179.866,25.045 180.025,25.204 180.025,29.83 180.303,30.108 180.789,30.108 181.066,29.83 181.066,25.204 181.226,25.045 181.544,25.045 181.703,25.204 181.703,29.678 181.981,29.955 182.467,29.955 182.744,29.678 182.744,25.607 183.141,25.21 183.839,25.21 187.332,25.21 188.019,25.21 188.297,24.933 188.297,24.237 188.456,24.078 188.774,24.078 188.934,24.237 188.934,24.966 189.211,25.244 189.697,25.244 189.975,24.966 189.975,23.891 190.134,23.732 190.452,23.732 190.612,23.891 190.612,24.966 190.889,25.244 191.375,25.244 191.653,24.966 191.653,23.891 191.812,23.732 192.13,23.732 192.29,23.891 192.29,24.966 192.567,25.244 193.053,25.244 193.331,24.966 193.331,23.891 193.49,23.732 193.808,23.732 193.968,23.891 193.968,24.933 194.245,25.21 194.426,25.21 197.169,25.21 197.62,25.661 199.011,27.052 204.185,27.052 204.501,26.736 204.501,26.311 204.862,25.95 J33.H8@205.1,25.95
SLOT3.LVDS_3_N: IC4.AF32 J29.C6 | length 97.8
  TopLayer w0.095: IC4.AF32@156.061,35.95 v1(156.561,35.45)
  Layer 3 w0.075: v1(156.561,35.45) 156.561,35.805 156.605,35.849 174.807,35.849 174.992,35.664 174.992,35.589 174.886,35.483 v1(174.886,35.395)
  Layer 5 w0.08: v1(174.886,35.395) 174.886,35.434 175.054,35.602 175.054,36.036 175.468,36.45 176.561,36.45 177.502,36.45 177.688,36.636 177.688,36.653 177.995,36.959 178.537,36.959 178.844,36.653 178.844,34.76 179.029,34.575 179.4,34.575 179.586,34.76 179.586,36.653 179.893,36.96 180.435,36.96 180.742,36.653 180.742,34.76 180.927,34.575 181.298,34.575 181.484,34.76 181.484,36.709 181.791,37.016 182.333,37.016 182.64,36.709 182.64,34.76 182.825,34.575 183.196,34.575 183.382,34.76 183.382,36.67 183.689,36.977 184.231,36.977 184.538,36.67 184.538,34.76 184.723,34.575 185.094,34.575 185.28,34.76 185.28,36.653 185.587,36.959 186.129,36.959 186.436,36.653 186.436,34.76 186.621,34.575 186.992,34.575 187.178,34.76 187.178,36.653 187.485,36.959 188.027,36.959 188.334,36.653 188.334,34.76 188.519,34.575 188.89,34.575 189.076,34.76 189.076,36.653 189.383,36.959 189.925,36.959 190.232,36.653 190.232,34.76 190.417,34.575 190.788,34.575 190.974,34.76 190.974,36.653 191.281,36.959 191.823,36.959 192.13,36.653 192.13,35.629 192.315,35.444 192.686,35.444 192.872,35.629 192.872,36.733 193.179,37.039 193.721,37.039 194.028,36.733 194.028,35.629 194.213,35.444 194.584,35.444 194.77,35.629 194.77,37.27 195.077,37.577 195.619,37.577 195.926,37.27 195.926,35.629 196.111,35.444 196.482,35.444 196.668,35.629 196.668,36.143 196.975,36.45 197.161,36.45 198.061,36.45 198.761,37.15 212.569,37.15 212.696,37.277 212.696,37.599 212.345,37.95 J29.C6@212.1,37.95
SLOT3.LVDS_3_P: IC4.AE32 J29.B6 | length 98.1
  TopLayer w0.095: IC4.AE32@156.061,36.95 v1(156.561,36.45)
  Layer 3 w0.075: v1(156.561,36.45) 156.561,36.095 156.605,36.051 174.891,36.051 175.429,35.513 v1(175.429,35.436)
  Layer 5 w0.08: v1(175.429,35.436) 175.429,35.475 175.261,35.642 175.261,35.95 175.554,36.243 176.561,36.243 177.588,36.243 177.895,36.55 177.895,36.567 178.08,36.752 178.451,36.752 178.637,36.567 178.637,34.675 178.944,34.368 179.486,34.368 179.793,34.675 179.793,36.568 179.978,36.753 180.349,36.753 180.535,36.568 180.535,34.675 180.842,34.368 181.384,34.368 181.691,34.675 181.691,36.623 181.876,36.809 182.247,36.809 182.433,36.623 182.433,34.675 182.74,34.368 183.282,34.368 183.589,34.675 183.589,36.585 183.774,36.77 184.145,36.77 184.331,36.585 184.331,34.675 184.638,34.368 185.18,34.368 185.487,34.675 185.487,36.567 185.672,36.752 186.043,36.752 186.229,36.567 186.229,34.675 186.536,34.368 187.078,34.368 187.385,34.675 187.385,36.567 187.57,36.752 187.941,36.752 188.127,36.567 188.127,34.675 188.434,34.368 188.976,34.368 189.283,34.675 189.283,36.567 189.468,36.752 189.839,36.752 190.025,36.567 190.025,34.675 190.332,34.368 190.874,34.368 191.181,34.675 191.181,36.567 191.366,36.752 191.737,36.752 191.923,36.567 191.923,35.544 192.23,35.237 192.772,35.237 193.079,35.544 193.079,36.647 193.264,36.832 193.635,36.832 193.821,36.647 193.821,35.544 194.128,35.237 194.67,35.237 194.977,35.544 194.977,37.184 195.162,37.37 195.533,37.37 195.719,37.184 195.719,35.544 196.026,35.237 196.568,35.237 196.875,35.544 196.875,36.058 197.06,36.243 197.161,36.243 198.147,36.243 198.847,36.943 212.655,36.943 212.903,37.192 212.903,37.599 213.255,37.95 J29.B6@213.5,37.95
SLOT3.LVDS_4_N: IC4.AE31 J29.F6 | length 97
  TopLayer w0.095: IC4.AE31@155.061,36.95 v1(155.561,36.45)
  Layer 5 w0.08: v1(175.521,37.476) 175.521,37.563 175.361,37.723 175.361,38.55 175.658,38.847 176.875,38.847 177.062,38.847 177.393,39.179 177.393,39.71 177.604,39.921 178.025,39.921 178.235,39.71 178.235,37.671 178.567,37.339 179.16,37.339 179.491,37.671 179.491,39.71 179.702,39.921 180.123,39.921 180.333,39.71 180.333,37.671 180.665,37.339 181.258,37.339 181.589,37.671 181.589,39.71 181.8,39.921 182.221,39.921 182.431,39.71 182.431,37.671 182.763,37.339 183.356,37.339 183.687,37.671 183.687,39.71 183.898,39.921 184.319,39.921 184.529,39.71 184.529,37.671 184.861,37.339 185.454,37.339 185.785,37.671 185.785,39.71 185.996,39.921 186.417,39.921 186.627,39.71 186.627,37.671 186.959,37.339 187.552,37.339 187.883,37.671 187.883,39.71 188.094,39.921 188.515,39.921 188.725,39.71 188.725,37.671 189.057,37.339 189.65,37.339 189.981,37.671 189.981,39.71 190.192,39.921 190.613,39.921 190.823,39.71 190.823,37.671 191.155,37.339 191.748,37.339 192.079,37.671 192.079,39.71 192.29,39.921 192.711,39.921 192.921,39.71 192.921,38.824 193.253,38.492 193.846,38.492 194.177,38.824 194.177,39.71 194.388,39.921 194.809,39.921 195.019,39.71 195.019,38.921 195.351,38.589 195.944,38.589 196.275,38.921 196.275,39.71 196.486,39.921 196.907,39.921 197.117,39.71 197.117,37.671 197.449,37.339 198.042,37.339 198.373,37.671 198.373,38.637 198.584,38.847 199.4,38.847 208.09,38.847 208.496,38.441 208.496,38.235 208.449,38.188 208.414,38.188 208.176,37.95 J29.F6@207.9,37.95
  Layer 6 w0.08: v1(155.561,36.45) 155.561,36.8 155.608,36.846 175.043,36.846 175.337,37.141 175.337,37.246 175.521,37.429 v1(175.521,37.476)